# Altium PCB VCU_PCB.PcbDoc
Units mm, origin at the board's own origin, x right, y up, seen from the top; angles counter-clockwise.
Board outline 80 x 70 mm, 4 copper layers (Top Layer, Layer 1, Layer 2, Bottom Layer), stack 0.995 mm thick; 135 components, 110 nets, 438 pads, 6 vias.
Unrouted connection lines stored in the file: 255.
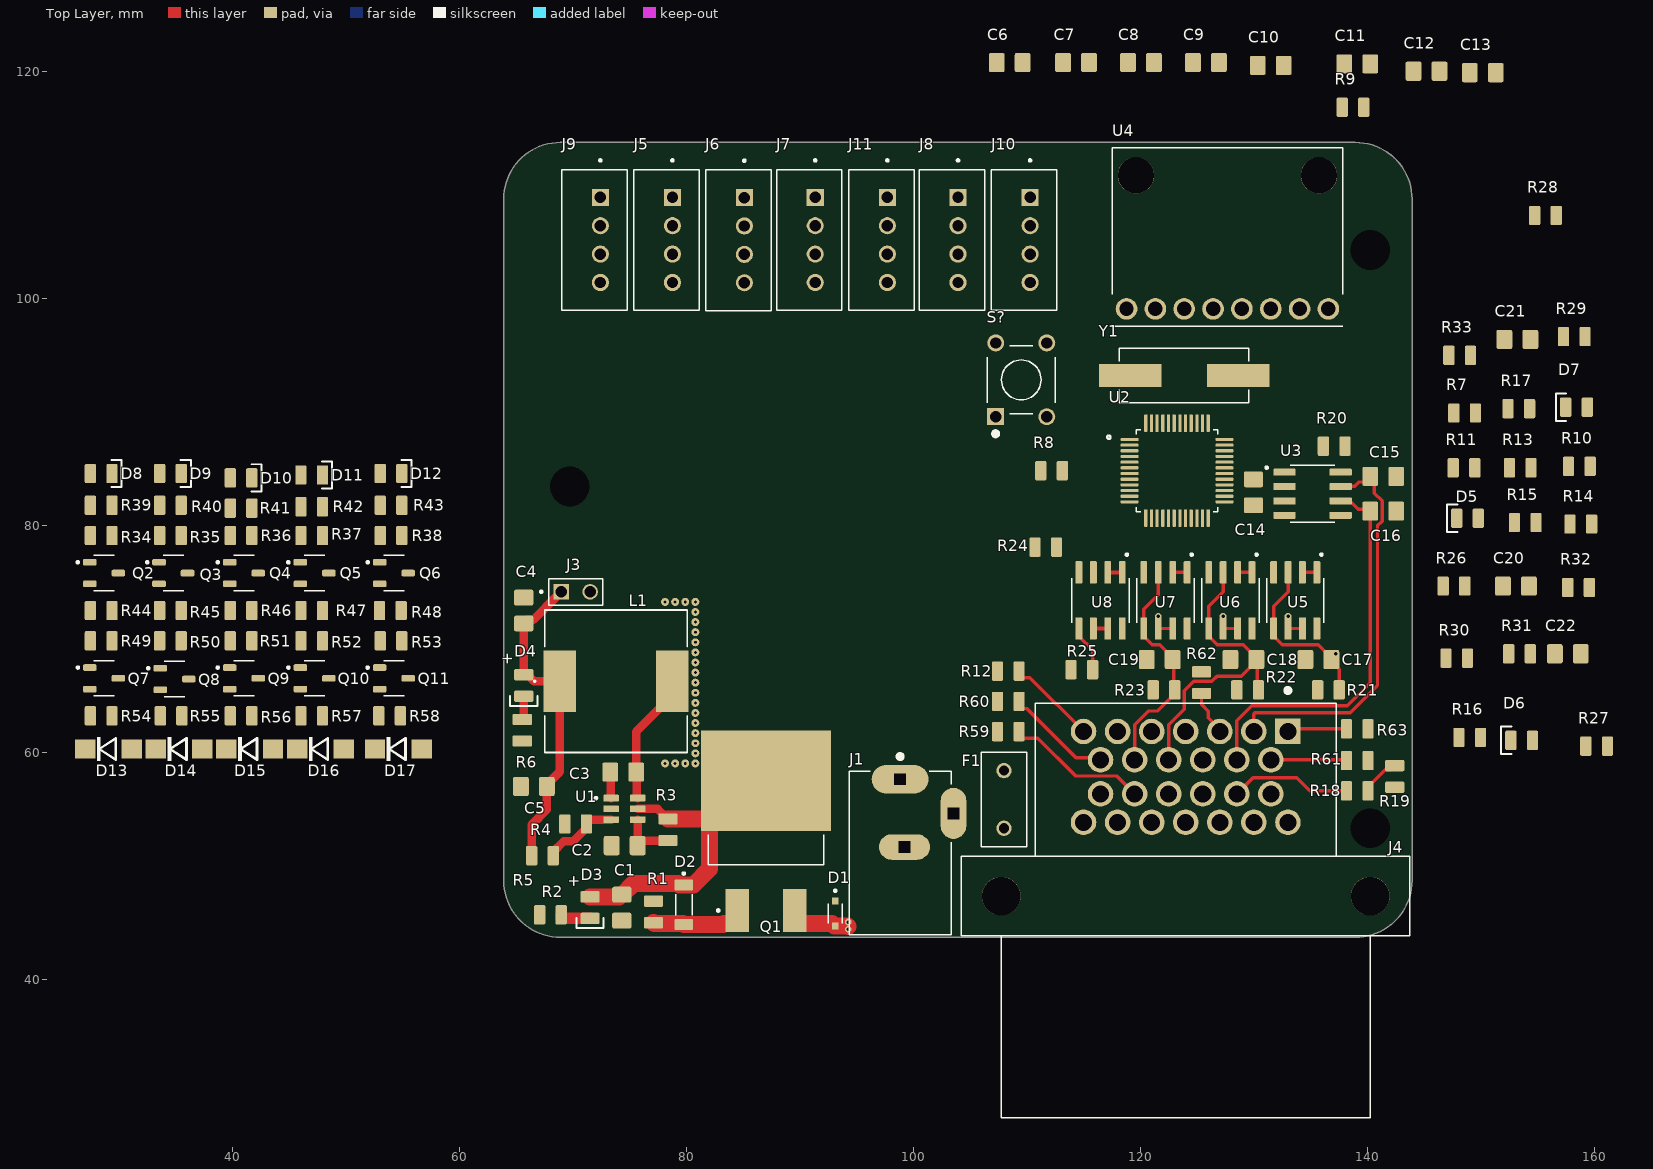
[diagram p0: Top Layer view]
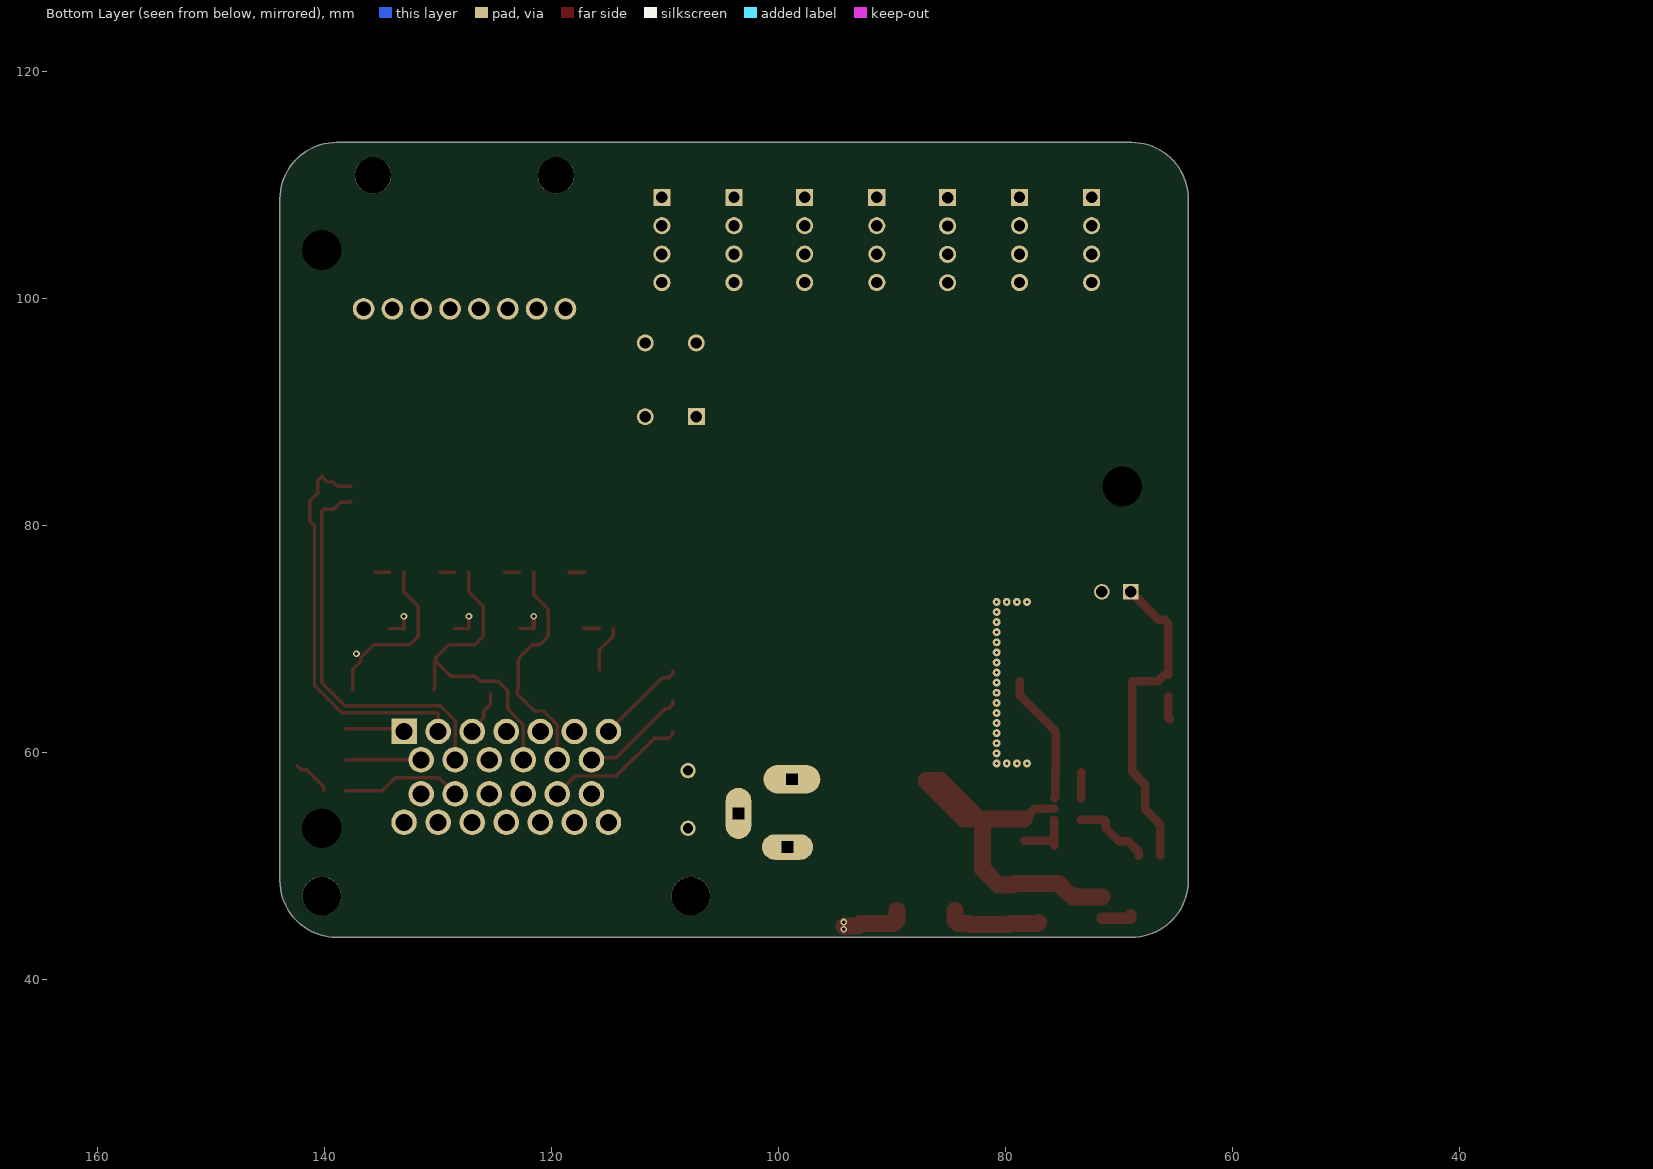
[diagram p1: Bottom Layer view, seen from below]
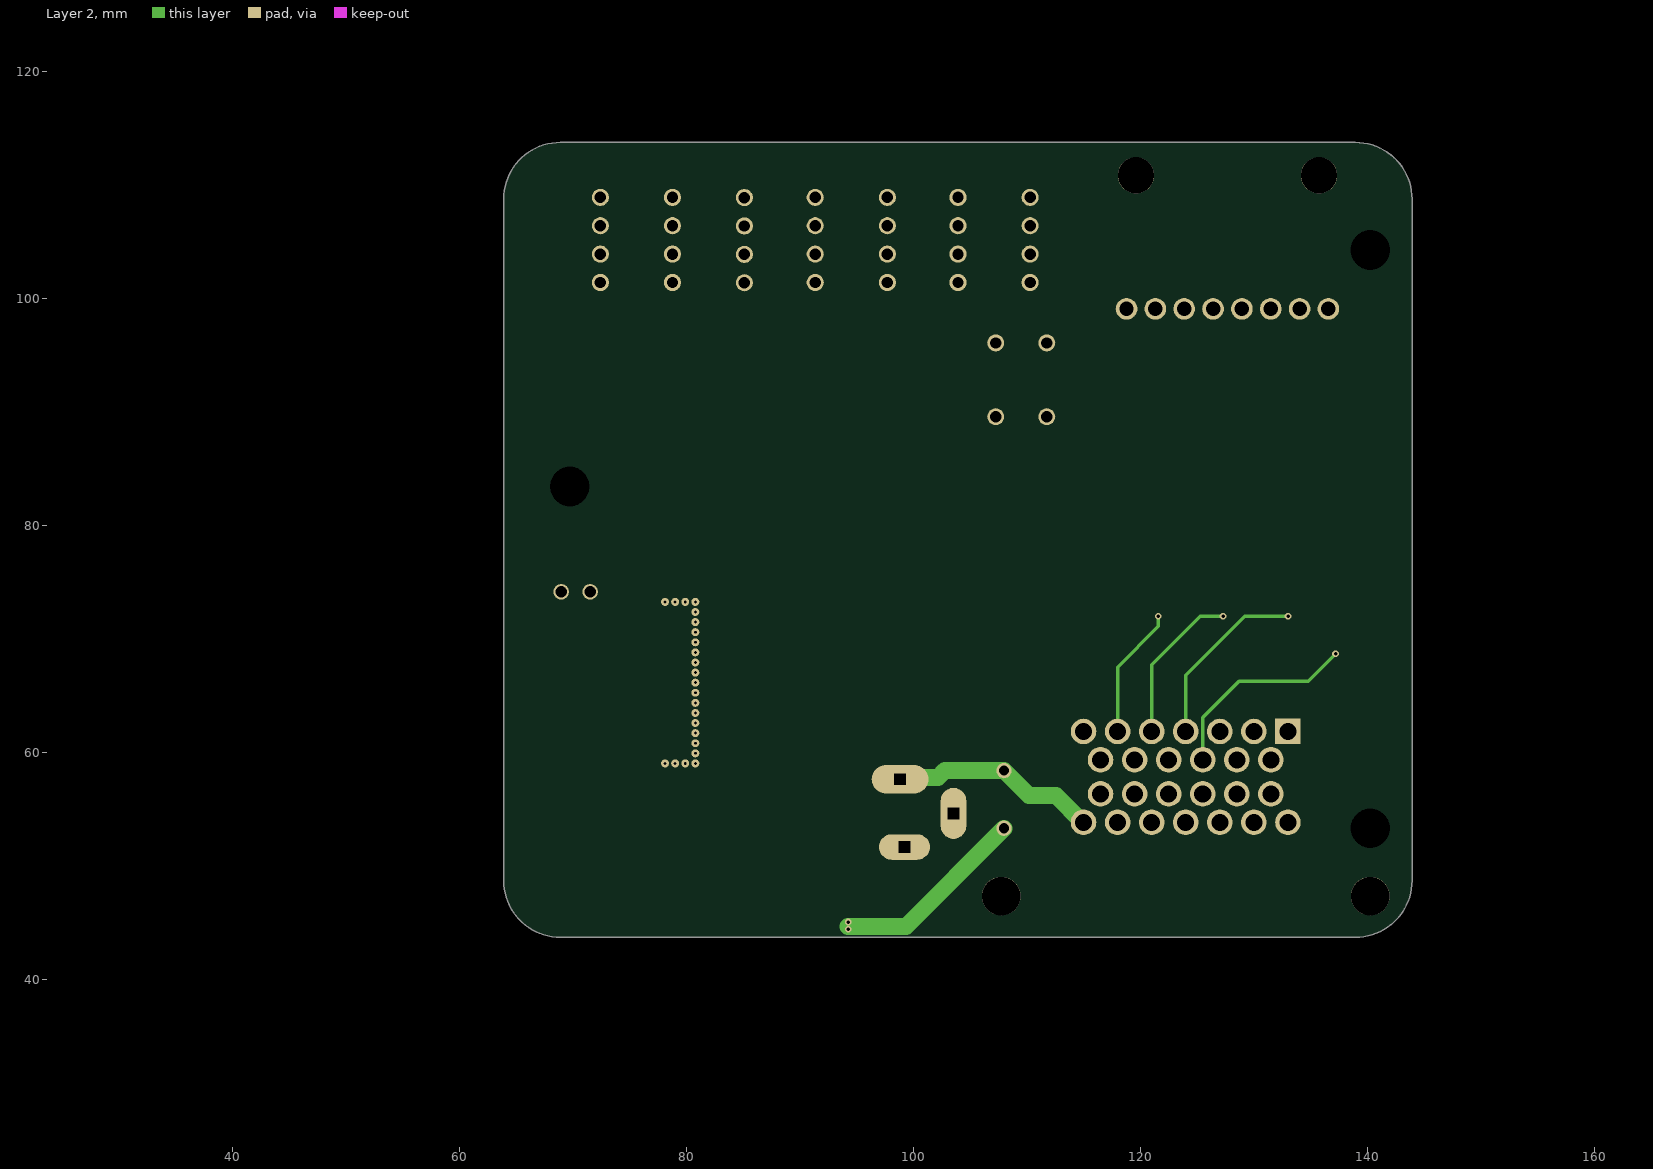
[diagram p2: Layer 2]

## Layer stack, top to bottom
Top Solder: solder mask 0.0102, Solder Resist, Dk 3.5
Top Layer: signal copper 0.0356
Dielectric 2: prepreg 0.1727, PP-020, Dk 4.5
Layer 1: signal copper 0.035
Dielectric 1: core 0.508, Core-036, Dk 4.6
Layer 2: signal copper 0.035
Dielectric 3: prepreg 0.1727, PP-020, Dk 4.5
Bottom Layer: signal copper 0.0356
Bottom Solder: solder mask 0.0102, Solder Resist, Dk 3.5

## Board outline
63.891,48.745 63.891,108.745 cw(c68.891,108.745) 68.891,113.745 138.891,113.745 cw(c138.891,108.745) 143.891,108.745 143.891,48.745 cw(c138.891,48.745) 138.891,43.745 68.891,43.745 cw(c68.891,48.745)

## Design rules (kind name [scope] priority, off if disabled: settings)
Clearance [All] p1: gap=0.15 ignorepadtopadclearanceinfootprint=FALSE
DiffPairsRouting [All] p1: maxlimit=0.254 minlimit=0.254 mostfreqgap=0.254 toplayer_minwidth=0.381 toplayer_maxwidth=0.381 toplayer_prefwidth=0.381 midlayer1_minwidth=0.381 midlayer1_maxwidth=0.381 midlayer1_prefwidth=0.381 midlayer2_minwidth=0.381 midlayer2_maxwidth=0.381 midlayer2_prefwidth=0.381 bottomlayer_minwidth=0.381 bottomlayer_maxwidth=0.381 bottomlayer_prefwidth=0.381 maxuncoupledlength=12.7
PolygonConnect [All] p1: connectstyle=Relief reliefconductorwidth=0.254 reliefentries=4 polygonreliefangle="90 Angle" airgapwidth=0.254
RoutingVias [All] p1: holewidth=0.3 width=0.7 viastyle="Through Hole" minholewidth=0.5 minwidth=0.5 maxholewidth=0.2 maxwidth=1
SolderMaskExpansion [All] p1: expansion=0 istentingtop=FALSE
SupplyNets "Schematic Supply Nets_7" [InNet('VCC_3V3')] p1: voltage=0.000
SupplyNets "Schematic Supply Nets_5" [InNet('VCC12V')] p2: voltage=0.000
SupplyNets "Schematic Supply Nets_4" [InNet('VCC3V3B')] p3: voltage=0.000
SupplyNets "Schematic Supply Nets_3" [InNet('DC_IN_12V')] p4: voltage=0.000
SupplyNets "Schematic Supply Nets_2" [InNet('DC_FUSE_12V')] p5: voltage=0.000
SupplyNets "Schematic Supply Nets_1" [InNet('GND')] p6: voltage=0.000
SupplyNets "Schematic Supply Nets" [InNet('VCC3V3')] p7: voltage=0.000
Width [All] p1: maxlimit=2 minlimit=0.15 preferedwidth=0.2
29 further rules are at their usual default settings.

## Classes and differential pairs
differential pair CAN: +CAN_P -CAN_N

## Components (designator, comment, footprint, x,y, rotation, side; value= is the part's Value field where it differs from the comment)
C1 "22uF" CAP_0805 74.295,46.355 r270 top
C2 "100nF" CAP_0805 74.549,51.816 r180 top
C3 "100nF" CAP_0805 74.422,58.293 r0 top
C4 "100nF" CAP_0805 65.659,72.517 r90 top
C5 "22uF" CAP_0805 66.548,57.023 r180 top
C6 "100nF" CAP_0805 108.458,120.777 r0 top
C7 "100nF" CAP_0805 114.3,120.777 r0 top
C8 "100nF" CAP_0805 120.015,120.777 r0 top
C9 "2.2uF" CAP_0805 125.73,120.777 r0 top
C10 "100nF" CAP_0805 131.445,120.523 r0 top
C11 "100nF" CAP_0805 139.065,120.65 r0 top
C12 "20pF" CAP_0805 145.161,120.015 r0 top
C13 "20pF" CAP_0805 150.114,119.888 r0 top
C14 "100nF" CAP_0805 129.921,82.931 r90 top
C15 "20pF" CAP_0805 141.351,84.328 r0 top
C16 "20pF" CAP_0805 141.351,81.28 r0 top
C17 "100nF" CAP_0805 135.636,68.199 r0 top
C18 "100nF" CAP_0805 129.032,68.199 r0 top
C19 "100nF" CAP_0805 121.666,68.199 r0 top
C20 "100nF" CAP_0805 153.035,74.676 r0 top
C21 "100nF" CAP_0805 153.162,96.393 r0 top
C22 "22nF" CAP_0805 157.607,68.707 r0 top
D1 "PESD1LIN" DIO_PESD1LIN 93.091,45.847 r270 top
D2 "ZMM2V2" DIOMELF3514N 79.756,46.609 r270 top
D3 "BLUE" LED_0805_BLUE 71.501,46.355 r90 top
D4 "BLUE" LED_0805_BLUE 65.659,65.913 r90 top
D5 "BLUE" LED_0805_BLUE 148.778,80.645 r0 top
D6 "BLUE" LED_0805_BLUE 153.543,61.087 r0 top
D7 "BLUE" LED_0805_BLUE 158.369,90.424 r0 top
D8 "BLUE" LED_0805_BLUE 28.448,84.582 r180 top
D9 "BLUE" LED_0805_BLUE 34.544,84.582 r180 top
D10 "BLUE" LED_0805_BLUE 40.767,84.201 r180 top
D11 "BLUE" LED_0805_BLUE 46.99,84.455 r180 top
D12 "BLUE" LED_0805_BLUE 53.975,84.582 r180 top
D13 "SS34-A" DO-214AC 29.083,60.325 r0 top
D14 "SS34-A" DO-214AC 35.306,60.325 r0 top
D15 "SS34-A" DO-214AC 41.529,60.325 r0 top
D16 "SS34-A" DO-214AC 47.752,60.325 r0 top
D17 "SS34-A" DO-214AC 54.61,60.325 r0 top
F1 "0697H0315-01" FUSRR508W60L835T400H810 107.95,55.88 r270 top
J1 "PJ-002B" CUI_PJ-002B 98.806,57.658 r270 top
J3 "3-644456-2" TE_3-644456-2 68.961,74.168 r0 top
J4 "9-6437287-8" TE_9-6437287-8 123.958,47.371 r0 top
J5 "B4B-XH-A" JST_B4B-XH-A 78.232,105.156 r90 top
J6 "B4B-XH-A" JST_B4B-XH-A 84.565,105.136 r90 top
J7 "B4B-XH-A" JST_B4B-XH-A 90.805,105.156 r90 top
J8 "B4B-XH-A" JST_B4B-XH-A 103.378,105.156 r90 top
J9 "B4B-XH-A" JST_B4B-XH-A 71.882,105.156 r90 top
J10 "B4B-XH-A" JST_B4B-XH-A 109.728,105.156 r90 top
J11 "B4B-XH-A" JST_B4B-XH-A 97.155,105.156 r90 top
L1 "10uH" IND_CDRH127/LDNP-470MC_SUM 73.787,66.294 r0 top
Q1 "IRF4905STRRPBF" TRANS_IRF4905STRRPBF 86.995,53.086 r90 top
Q2 "AO3400A" SOT95P280X125-3N 28.702,75.819 r0 top
Q3 "AO3400A" SOT95P280X125-3N 34.798,75.819 r0 top
Q4 "AO3400A" SOT95P280X125-3N 41.021,75.819 r0 top
Q5 "AO3400A" SOT95P280X125-3N 47.244,75.819 r0 top
Q6 "AO3400A" SOT95P280X125-3N 54.229,75.819 r0 top
Q7 "AO3407A" SOT95P280X125-3N 28.702,66.548 r0 top
Q8 "AO3407A" SOT95P280X125-3N 34.91,66.482 r0 top
Q9 "AO3407A" SOT95P280X125-3N 41.021,66.548 r0 top
Q10 "AO3407A" SOT95P280X125-3N 47.244,66.548 r0 top
Q11 "AO3407A" SOT95P280X125-3N 54.229,66.548 r0 top
R1 "10K" RES_0805 77.089,45.974 r270 top
R2 "5K" RES_0805 68.011,45.72 r0 top
R3 "10K" RES_0805 78.359,53.213 r270 top
R4 "22K" RES_0805 70.231,53.721 r0 top
R5 "100K" RES_0805 67.31,50.927 r180 top
R6 "1.5K" RES_0805 65.532,61.976 r90 top
R7 "0R" RES_0805 148.524,89.916 r0 top
R8 "2.2K" RES_0805 112.141,84.836 r0 top
R9 "2.2K" RES_0805 138.684,116.84 r0 top
R10 "220R" RES_0805 158.623,85.217 r0 top
R11 "220R" RES_0805 148.463,85.09 r0 top
R12 "220R" RES_0805 108.331,67.183 r0 top
R13 "220R" RES_0805 153.416,85.09 r0 top
R14 "220R" RES_0805 158.75,80.137 r0 top
R15 "220R" RES_0805 153.858,80.264 r0 top
R16 "220R" RES_0805 148.971,61.341 r0 top
R17 "220R" RES_0805 153.289,90.297 r0 top
R18 "27K" RES_0805 139.065,56.642 r0 top
R19 "10K" RES_0805 142.367,57.912 r90 top
R20 "4.7K" RES_0805 137.033,86.995 r0 top
R21 "10K" RES_0805 136.525,65.532 r0 top
R22 "10K" RES_0805 129.413,65.532 r0 top
R23 "10K" RES_0805 122.047,65.532 r0 top
R24 "2.2K" RES_0805 111.633,78.105 r0 top
R25 "2.2K" RES_0805 114.808,67.31 r0 top
R26 "1.5K" RES_0805 147.574,74.676 r0 top
R27 "1.5K" RES_0805 160.147,60.579 r0 top
R28 "10K" RES_0805 155.636,107.315 r0 top
R29 "20K" RES_0805 158.176,96.647 r0 top
R30 "27K" RES_0805 147.828,68.326 r0 top
R31 "10K" RES_0805 153.35,68.707 r0 top
R32 "27K" RES_0805 158.557,74.549 r0 top
R33 "10K" RES_0805 148.082,94.996 r0 top
R34 "1K" RES_0805 28.448,79.121 r180 top
R35 "1K" RES_0805 34.544,79.121 r180 top
R36 "1K" RES_0805 40.767,79.121 r180 top
R37 "1K" RES_0805 46.99,79.121 r180 top
R38 "1K" RES_0805 53.975,79.121 r180 top
R39 "1K" RES_0805 28.448,81.788 r0 top
R40 "1K" RES_0805 34.544,81.788 r0 top
R41 "1K" RES_0805 40.767,81.534 r0 top
R42 "1K" RES_0805 46.99,81.661 r0 top
R43 "1K" RES_0805 53.975,81.788 r0 top
R44 "10K" RES_0805 28.448,72.517 r0 top
R45 "10K" RES_0805 34.544,72.517 r0 top
R46 "10K" RES_0805 40.767,72.517 r0 top
R47 "10K" RES_0805 46.99,72.517 r0 top
R48 "10K" RES_0805 53.909,72.517 r0 top
R49 "1K" RES_0805 28.448,69.85 r180 top
R50 "1K" RES_0805 34.544,69.85 r180 top
R51 "1K" RES_0805 40.767,69.85 r180 top
R52 "1K" RES_0805 46.99,69.85 r180 top
R53 "1K" RES_0805 53.975,69.85 r180 top
R54 "10K" RES_0805 28.448,63.246 r180 top
R55 "10K" RES_0805 34.605,63.246 r180 top
R56 "10K" RES_0805 40.767,63.246 r180 top
R57 "10K" RES_0805 46.99,63.246 r180 top
R58 "10K" RES_0805 53.848,63.246 r180 top
R59 "10K" RES_0805 108.331,61.849 r0 top
R60 "" RES_0805 108.331,64.516 r0 top
R61 "" RES_0805 139.065,59.309 r180 top
R62 "" RES_0805 125.349,66.167 r270 top
R63 "" RES_0805 139.065,62.103 r180 top
S? "FSM8JH" SW_FSM8JH 109.474,92.837 r90 top
U1 "MT2492" "PCBComponent_1 - duplicate" 84.301,55.56 r0 top
U2 "STM32F103C8T6" QFP50P900X900X160-48N 123.19,84.836 r0 top
U3 "SN65HVD230D" SOIC127P599X175-8N 135.128,82.804 r0 top
U4 "GY-521" MODULE_GY-521 127.635,105.41 r90 top
U5 "TLV2372IDR" SOIC127P599X175-8N 133.604,73.406 r270 top
U6 "TLV2372IDR" SOIC127P599X175-8N 127.889,73.406 r270 top
U7 "TLV2372IDR" SOIC127P599X175-8N 122.174,73.406 r270 top
U8 "TLV2372IDR" SOIC127P599X175-8N 116.459,73.406 r270 top
Y1 "8MHz" XTAL_ECS-80-20-5PVX 123.825,93.218 r180 top

## Footprints (in the part's own frame and the unit in brackets; to place one, negate y for a bottom-side part, rotate by r counter-clockwise, add the part's x,y. Pads: shape width x height; smd on the part's side, far side on the other; paste and mask are expansions set on the pad)
CAP_0805 [mm]
  rrect25% 1.4x1.7 smd: 1(-1.143,0) 2(1.143,0)
  body extent -1.15,-0.76 1.15,0.79, height 1.01
CUI_PJ-002B [mm]
  oval 2.5x5 hole 1 square: 1(0,0)
  oval 2.25x4.5 hole 1 square: 2(5.969,0.381)
  oval 4.5x2.25 hole 1 square: 3(3,4.7)
  silkscreen extent -2.2,-4.5 13.7,4.5, body extent -0.81,-4.63 13.59,4.77, height 11
DIO_PESD1LIN [mm]
  rect 0.6x0.6 smd paste-0.05: 1(-1.1,0) 2(1.1,0)
  silkscreen extent -2.1,-0.63 0.85,0.63, body extent -1.34,-0.65 1.34,0.65, height 1.15
DIOMELF3514N [mm]
  rrect25% 0.96x1.65 smd paste+0 mask+0.102: 1(-1.735,0) 2(1.735,0)
  silkscreen extent -2.85,-0.72 0.93,0.72
DO-214AC [mm]
  rect 1.8x1.7 smd: A(2.05,0) C(-2.05,0)
  silkscreen extent -1,-1.05 0.65,1.05
FUSRR508W60L835T400H810 [mm]
  round 1.35 hole 0.9: 1(-2.54,0) 2(2.54,0)
  silkscreen extent -4.18,-2 4.18,2, body extent -4.18,-2 4.18,2, height 8.1
IND_CDRH127/LDNP-470MC_SUM [mil]
  rect 114x213 smd: 1(-195,0) 2(195,0)
  silkscreen extent -285,-247 247,247, body extent -236,-236 236,236, height 315
JST_B4B-XH-A [mm]
  rect 1.508x1.508 / inner round 1.508 / far side rect 1.508x1.508 hole 1: 1(3.75,-0.525)
  round 1.508 hole 1: 2(1.25,-0.525) 3(-1.25,-0.525) 4(-3.75,-0.525)
  silkscreen extent -6.2,-2.88 7.1,2.88, body extent -6.2,-2.88 6.2,2.88, height 7
LED_0805_BLUE [mm]
  rrect25% 1x1.7 smd: A(0.95,0) K(-0.95,0)
  silkscreen extent -1.8,-1.2 -0.9,1.2, body extent -1,-0.63 1,0.63, height 1.12
MODULE_GY-521 [mm]
  round 1.905 hole 1.27 mask+0.102: AD0(-6.33,-6.35) GND(-6.33,6.35) INT(-6.33,-8.89) SCL(-6.33,3.81) SDA(-6.33,1.27) VCC(-6.33,8.89) XCL(-6.33,-3.81) XDA(-6.33,-1.27)
  round 3.2 hole 3.2 unplated mask+0: ""(5.43,8.06) ""(5.43,-8.06)
  silkscreen extent -7.85,-10.15 7.85,10.15, body extent -7.85,-10.15 7.85,10.15, height 3
"PCBComponent_1 - duplicate" [mm]
  rrect25% 1.37x0.59 smd: 1(-10.949,0.442) 2(-10.949,-0.508) 3(-10.949,-1.458) 4(-8.609,-1.458) 5(-8.609,-0.508) 6(-8.609,0.442)
  silkscreen extent -12.38,0.34 -12.18,0.54, body extent -11.18,-1.97 -8.38,0.95, height 1.4
QFP50P900X900X160-48N [mm]
  rrect50% 1.56x0.28 smd: 1(-4.18,2.75) 2(-4.18,2.25) 3(-4.18,1.75) 4(-4.18,1.25) 5(-4.18,0.75) 6(-4.18,0.25) 7(-4.18,-0.25) 8(-4.18,-0.75) 9(-4.18,-1.25) 10(-4.18,-1.75) 11(-4.18,-2.25) 12(-4.18,-2.75) 25(4.18,-2.75) 26(4.18,-2.25) 27(4.18,-1.75) 28(4.18,-1.25) 29(4.18,-0.75) 30(4.18,-0.25) 31(4.18,0.25) 32(4.18,0.75) 33(4.18,1.25) 34(4.18,1.75) 35(4.18,2.25) 36(4.18,2.75)
  rrect50% 0.28x1.56 smd: 13(-2.75,-4.18) 14(-2.25,-4.18) 15(-1.75,-4.18) 16(-1.25,-4.18) 17(-0.75,-4.18) 18(-0.25,-4.18) 19(0.25,-4.18) 20(0.75,-4.18) 21(1.25,-4.18) 22(1.75,-4.18) 23(2.25,-4.18) 24(2.75,-4.18) 37(2.75,4.18) 38(2.25,4.18) 39(1.75,4.18) 40(1.25,4.18) 41(0.75,4.18) 42(0.25,4.18) 43(-0.25,4.18) 44(-0.75,4.18) 45(-1.25,4.18) 46(-1.75,4.18) 47(-2.25,4.18) 48(-2.75,4.18)
  silkscreen extent -6.15,-3.6 3.6,3.6, body extent -4.5,-4.5 4.5,4.5, height 1.6
RES_0805 [mm]
  rrect25% 1x1.7 smd: 1(-0.95,0) 2(0.95,0)
  body extent -1,-0.63 1,0.63, height 0.47
SOIC127P599X175-8N [mm]
  rrect25% 1.97x0.6 smd paste+0 mask+0.102: 1(-2.47,1.905) 2(-2.47,0.635) 3(-2.47,-0.635) 4(-2.47,-1.905) 5(2.47,-1.905) 6(2.47,-0.635) 7(2.47,0.635) 8(2.47,1.905)
  silkscreen extent -4.14,-2.52 1.95,2.52, body extent -3,-2.45 3,2.45, height 1.75
SOT95P280X125-3N [mm]
  rrect50% 1.21x0.59 smd: 1(-1.255,0.95) 2(-1.255,-0.95) 3(1.255,0)
  silkscreen extent -2.41,-1.55 0.9,1.55, body extent -1.4,-1.45 1.4,1.45, height 1.25
SW_FSM8JH [mm]
  rect 1.498x1.498 / inner round 1.498 / far side rect 1.498x1.498 hole 0.99: 1(-3.25,2.25)
  round 1.498 hole 0.99: 2(-3.25,-2.25) 3(3.25,2.25) 4(3.25,-2.25)
  silkscreen extent -4.95,-3 3,3, body extent -3.95,-3 3.95,3, height 9.5
TE_3-644456-2 [mm]
  rect 1.37x1.37 / inner round 1.37 / far side rect 1.37x1.37 hole 1.02: 1(0,0)
  round 1.37 hole 1.02: 2(2.54,0)
  silkscreen extent -1.87,-1.17 3.66,1.17, body extent -1.12,-1.17 3.66,1.17, height 10.03
TE_9-6437287-8 [mm]
  rect 2.25x2.25 hole 1.5: 1(9,14.5)
  round 2.25 hole 1.5: 2(6,14.5) 3(3,14.5) 4(0,14.5) 5(-3,14.5) 6(-6,14.5) 7(-9,14.5) 8(7.5,12) 9(4.5,12) 10(1.5,12) 11(-1.5,12) 12(-4.5,12) 13(-7.5,12) 14(7.5,9) 15(4.5,9) 16(1.5,9) 17(-1.5,9) 18(-4.5,9) 19(-7.5,9) 20(9,6.5) 21(6,6.5) 22(3,6.5) 23(0,6.5) 24(-3,6.5) 25(-6,6.5) 26(-9,6.5)
  round 3.4 hole 3.4 unplated: ""(-16.25,0) ""(16.25,0)
  silkscreen extent -19.75,-19.5 19.75,18.31
TRANS_IRF4905STRRPBF [mm]
  rect 3.81x2.08 smd: 1(-6.985,2.54) 3(-6.985,-2.54)
  rect 8.89x11.43 smd paste-7: 2(4.445,0)
  silkscreen extent -7.08,-5.08 -0.32,5.08, body extent -7.62,-5.08 7.62,5.08, height 4.83
XTAL_ECS-80-20-5PVX [mm]
  rect 5.5x2 smd: 1(-4.75,0) 2(4.75,0)
  silkscreen extent -5.7,-2.4 5.7,2.4, body extent -6.6,-2.35 6.6,2.35, height 2.6

## Part data
C1 C2 C3 C4 C5 C6 C7 C8 C9 C10 C11 C12 C13 C14 C15 C16 C17 C18 C19 C20 C21 C22: library part CAP_0805, "Capacitor SMD 0805"
D1: "44V, 70V Clamp 3A (8/20Âµs) Ipp Tvs Diode Surface Mount SOD-323", Package="SOD-323 Vishay Semiconductor Diodes Division", Check_prices=https://www.snapeda.com/parts/PESD1LIN/Nexperia/view-part/?ref=eda, MF="Nexperia USA", MP=PESD1LIN, SnapEDA_Link=https://www.snapeda.com/parts/PESD1LIN/Nexperia/view-part/?ref=snap
D2: "2.2V 500mW Silicon Epitaxial Planar Zener Diodes SMD MiniMELF (LL34)", Package=None, Check_prices=https://www.snapeda.com/parts/ZMM2V2/Kingtronics/view-part/?ref=eda, MF=Kingtronics, MP=ZMM2V2, SnapEDA_Link=https://www.snapeda.com/parts/ZMM2V2/Kingtronics/view-part/?ref=snap
D3 D4 D5 D6 D7 D8 D9 D10 D11 D12: library part LED_0805_BLUE, "LED 0805 BLUE SMD"
D13 D14 D15 D16 D17: "Schottky barrier diode, 3A, 40V", Package=None, Check_prices=https://www.snapeda.com/parts/SS34A/HY+Electronic/view-part/?ref=eda, MF="hy electronic corp", MP=SS34A, SnapEDA_Link=https://www.snapeda.com/parts/SS34A/HY+Electronic/view-part/?ref=snap
F1: "2-Pin Radial Fuse", Package="Radial Box  Bel Fuse", Check_prices=https://www.snapeda.com/parts/0697H0315-01/Bel+Circuit+Protection/view-part/?ref=eda, MF="Bel Fuse", MP=0697H0315-01, SnapEDA_Link=https://www.snapeda.com/parts/0697H0315-01/Bel+Circuit+Protection/view-part/?ref=snap
J1: "2.5 x 6.5 mm, 2.5 A, Horizontal, Through Hole, Dc Power Jack Connector", Package=None, Check_prices=https://www.snapeda.com/parts/PJ-002B/Same+Sky/view-part/?ref=eda, MF="Same Sky", MP=PJ-002B, SnapEDA_Link=https://www.snapeda.com/parts/PJ-002B/Same+Sky/view-part/?ref=snap
J3: "HEADER ASSEMBLY, NARROW, MTA-100, 2 POSITION, STRAIGHT", Package=None, Check_prices=https://www.snapeda.com/parts/3-644456-2/TE+Connectivity+AMP+Connectors/view-part/?ref=eda, MF="TE Connectivity", MP=3-644456-2, SnapEDA_Link=https://www.snapeda.com/parts/3-644456-2/TE+Connectivity+AMP+Connectors/view-part/?ref=snap
J4: Package=None, Availability=Unavailable, MF="{'manufacturer': 'TE Connectivity'}", MP=9-6437287-8, Price=None
J5 J6 J7 J8 J9 J10 J11: "Connector Header Through Hole 4 position 0.098 (2.50mm)", Package=None, Check_prices=https://www.snapeda.com/parts/B4B-XH-A/JST/view-part/?ref=eda, MF="JST Sales", MP=B4B-XH-A, SnapEDA_Link=https://www.snapeda.com/parts/B4B-XH-A/JST/view-part/?ref=snap
L1: library part CDRH127/LDNP-470MC, "Inductor Power Shielded Drum Core 47uH 20% 1KHz Ferrite 4.1A 0.078Ohm DCR T/R", Package="Non Standard Sumida", Check_prices=https://www.snapeda.com/parts/CDRH127/LDNP-470MC/Sumida/view-part/?ref=eda, MF="Sumida Corporation", MP=CDRH127/LDNP-470MC, SnapEDA_Link=https://www.snapeda.com/parts/CDRH127/LDNP-470MC/Sumida/view-part/?ref=snap
Q1: "RoHS Compliant", Package="D2PAK Infineon", Availability="In Stock", Check_prices=https://www.snapeda.com/parts/IRF4905STRRPBF/Infineon+Technologies/view-part/?ref=eda, MF="Infineon Technologies", MP=IRF4905STRRPBF, Price=None, Purchase-URL=https://pricing.snapeda.com/search/part/IRF4905STRRPBF/?ref=eda, SnapEDA_Link=https://www.snapeda.com/parts/IRF4905STRRPBF/Infineon+Technologies/view-part/?ref=snap
Q2 Q3 Q4 Q5 Q6: "N-Channel 30 V 5.8A (Ta) 1.4W (Ta) Surface Mount SOT-23", Package=None, Check_prices=https://www.snapeda.com/parts/AO3400A/UMW/view-part/?ref=eda, MF=UMW, MP=AO3400A, SnapEDA_Link=https://www.snapeda.com/parts/AO3400A/UMW/view-part/?ref=snap
Q7 Q8 Q9 Q10 Q11: "P-Channel 30 V 4.3A (Ta) 1.4W (Ta) Surface Mount SOT-23-3", Package="SOT-23 Alpha &amp; Omega Semiconductor", Check_prices=https://www.snapeda.com/parts/AO3407A/Alpha/view-part/?ref=eda, MF="Alpha &", MP=AO3407A, SnapEDA_Link=https://www.snapeda.com/parts/AO3407A/Alpha/view-part/?ref=snap
R1 R2 R3 R4 R5 R6 R7 R8 R9 R10 R11 R12 R13 R14 R15 R16 R17 R18 R19 R20 R21 R22 R23 R24 R25 R26 R27 R28 R29 R30 R31 R32 R33 R34 R35 R36 R37 R38 R39 R40 R41 R42 R43 R44 R45 R46 R47 R48 R49 R50 R51 R52 R53 R54 R55 R56 R57 R58 R59 R60 R61 R62 R63: library part RES_0805, "Resistor SMD 0805"
S?: "Tactile Switch SPST-NO Top Actuated Through Hole", Package=None, Availability="In Stock", Check_prices=https://www.snapeda.com/parts/FSM8JH/TE+Connectivity+ALCOSWITCH+Switches/view-part/?ref=eda, MF="TE Connectivity", MP=FSM8JH, Price=None, SnapEDA_Link=https://www.snapeda.com/parts/FSM8JH/TE+Connectivity+ALCOSWITCH+Switches/view-part/?ref=snap
U1: "DC-DC step-down converter (buck converter)"
U2: "ARM® Cortex®-M3 STM32F1 Microcontroller IC 32-Bit 72MHz 64KB (64K x 8) FLASH 48-LQFP (7x7)", Package="LQFP-48 STMicroelectronics", Check_prices=https://www.snapeda.com/parts/STM32F103C8T6/STMicroelectronics/view-part/?ref=eda, MF=STMicroelectronics, MP=STM32F103C8T6, SnapEDA_Link=https://www.snapeda.com/parts/STM32F103C8T6/STMicroelectronics/view-part/?ref=snap
U3: "3.3 V CAN Transceiver with Standby Mode", Package="SOIC-8 Texas Instruments", Check_prices=https://www.snapeda.com/parts/SN65HVD230D/Texas+Instruments/view-part/?ref=eda, MF="Texas Instruments", MP=SN65HVD230D, SnapEDA_Link=https://www.snapeda.com/parts/SN65HVD230D/Texas+Instruments/view-part/?ref=snap
U4: "Triple Axis Accelerometer Gyro Breakout", Package=Package, Check_prices=https://www.snapeda.com/parts/GY-521/GODREAM+FORDREAM+CO.%252C+LIMITED/view-part/?ref=eda, MF="GODREAM FORDREAM CO., LIMITED", MP=GY-521, SnapEDA_Link=https://www.snapeda.com/parts/GY-521/GODREAM+FORDREAM+CO.%252C+LIMITED/view-part/?ref=snap
U5 U6 U7 U8: "Dual, 16-V, 3-MHz, RRIO operational amplifier", Package="SOIC-8 Texas Instruments", Check_prices=https://www.snapeda.com/parts/TLV2372IDR/Texas+Instruments/view-part/?ref=eda, MF="Texas Instruments", MP=TLV2372IDR, SnapEDA_Link=https://www.snapeda.com/parts/TLV2372IDR/Texas+Instruments/view-part/?ref=snap
Y1: library part ECS-80-20-5PVX, "SMD Quartz crystal", Package=None, Availability=Unavailable, MP=ECS-80-20-5PVX, Price=None

## Free pads (board coordinates)
  round 0 hole 3.5 unplated: 1(140.208,53.34) 2(140.208,104.267) 3(69.723,83.439)
  round 0.7 hole 0.25: 4(80.772,72.39) 5(80.772,71.501) 6(80.772,70.612) 7(80.772,69.723) 8(80.772,68.834) 9(80.772,67.945) 10(80.772,67.056) 11(80.772,66.167) 12(80.772,65.278) 13(80.772,64.389) 14(80.772,63.5) 15(80.772,62.611) 16(80.772,61.722) 17(80.772,60.833) 18(80.772,59.944) 19(80.772,59.055) 20(79.883,59.055) 21(78.994,59.055) 22(78.105,59.055) 23(80.772,73.279) 24(79.883,73.279) 25(78.105,73.279) 25(78.994,73.279)

## Via types
v1: diameter 0.6, hole 0.3, Top Layer to Bottom Layer, 6 vias

## Nets (pads, with @x,y where several pads share a name; then routed paths per layer and width w, separated by ;. In a path a pad name is that pad's centre, name@x,y a point inside that pad or via, vN(x,y) a via of type N, cw(c..) or ccw(c..) an arc to the next point about the centre after c; other vN are vias at no path point)
APP1SHIFTVCC: J4.13 R60.2 | length 9.5
  Top Layer w0.3: R60.2 109.281,64.242 109.631,63.892 109.971,63.892 114.296,59.567 116.262,59.567 J4.13
APP2SHIFTVCC: J4.3 R62.2 | length 4
  Top Layer w0.3: R62.2 125.349,64.267 125.948,63.668 125.948,63.089 126.958,62.079 J4.3
APPS1: C17.2 J4.10 R21.2 U5.3 U5.5 | length 32.7
  Top Layer w0.3: U5.3 132.969,74.168 131.699,72.898 U5.5 131.699,70.251 132.45,69.5 135.628,69.5 136.779,68.349 C17.2 ; C17.2@136.779,68.049 137.475,67.353 R21.2
  Layer 2 w0.3: J4.10 125.458,63.101 128.651,66.294 134.747,66.294 v1(137.16,68.707)
APPS1HIFTGND: J4.8 R61.2 | length 6.7
  Top Layer w0.3: J4.8 138.053,59.371 R61.2
APPS2: C18.2 J4.11 R22.2 U6.3 U6.5 | length 28.2
  Top Layer w0.3: J4.11 122.458,62.444 123.838,63.823 123.838,65.464 124.65,66.276 126.267,66.276 126.713,66.723 128.849,66.723 130.175,68.049 C18.2 ; U6.3 127.254,74.168 125.984,72.898 U6.5 125.984,70.251 126.735,69.5 129.024,69.5 130.175,68.349 C18.2 ; R22.2 130.269,65.626 130.269,68.105 C18.2
APPS2HIFTGND: J4.1 R63.2 | length 5.3
  Top Layer w0.3: J4.1 133.19,62.103 R63.2
BL: D14.A J4.21 Q8.3
BPS: C19.2 J4.12 R23.2 U7.3 U7.5 | length 20.5
  Top Layer w0.3: J4.12 119.458,62.444 120.69,63.675 121.49,63.675 122.997,65.182 R23.2 122.903,65.626 122.903,68.105 C19.2 122.809,68.349 121.658,69.5 121.02,69.5 120.269,70.251 U7.5 120.269,72.644 121.539,73.914 U7.3
BS: C3.1 U1.1 | length 2.3
  Top Layer w0.75: C3.1 73.315,58.257 73.315,56.039 U1.1
CAN_N: C16.1 J4.9 U3.6 | length 34.7
  Top Layer w0.3: J4.9 128.458,62.808 129.599,63.949 129.785,64.135 138.167,64.135 140.208,66.176 C16.1 140.05,81.438 139.16,81.438 138.538,82.06 137.707,82.06 U3.6
CAN_P: C15.1 J4.2 U3.7 | length 35.5
  Top Layer w0.3: J4.2 129.958,63.41 130.048,63.5 138.43,63.5 140.843,65.913 140.843,79.986 141.249,80.391 141.249,82.169 140.574,82.843 140.574,83.962 C15.1 139.715,83.835 139.207,83.835 138.848,83.476 137.635,83.476 U3.7
CFB: D16.A J4.24 Q10.3
CFM: D15.A J4.25 Q9.3
DC_FUSE_12V: D1.2 F1.2 Q1.3 | length 23.1
  Top Layer w1.5: Q1.3 89.535,45.236 89.825,44.946 92.825,44.946 93.024,44.747 D1.2 94.191,44.747 v1@94.234,44.704
  Layer 2 w1.5: v1@94.234,44.704 99.314,44.704 F1.2
  other v1: 94.234,44.45 94.234,45.085
DC_IN_12V: F1.1 J1.1 J4.26 | length 18.4
  Layer 2 w1.5: J1.1 98.956,57.808 102.131,57.808 102.743,58.42 F1.1 110.153,56.217 112.531,56.217 114.878,53.871 J4.26
DTI_APPS1: J4.4 U5.6 U5.7 | length 18.4
  Top Layer w0.3: U5.6 U5.7
  Top Layer w0.381: U5.6 v1(132.969,72.009)
  Layer 2 w0.3: J4.4 123.958,66.808 129.159,72.009 v1(132.969,72.009)
DTI_APPS2: J4.5 U6.6 U6.7 | length 16.3
  Top Layer w0.3: v1(127.254,72.009) U6.6 U6.7
  Layer 2 w0.3: J4.5 120.958,67.745 125.222,72.009 v1(127.254,72.009)
DTI_BPS: J4.6 U7.6 U7.7 | length 14
  Top Layer w0.3: U7.6 U7.7
  Top Layer w0.381: U7.6 v1(121.539,72.009)
  Layer 2 w0.3: J4.6 117.958,67.539 121.539,71.12 v1(121.539,72.009)
EN: C2.1 R3.2 U1.4 | length 5.1
  Top Layer w0.75: C2.1 U1.4 ; C2.1@75.692,51.938 76.017,52.263 R3.2
FB: R4.2 R5.1 U1.3 | length 7
  Top Layer w0.75: R5.1 68.26,51.277 69.168,52.185 69.995,52.185 71.181,53.371 R4.2 71.181,53.977 71.306,54.102 U1.3
GND: C1.2 C2.2 C4.2 C5.2 C6.2 C7.2 C8.2 C9.2 C10.1 C12.2 C13.2 C14.2 C15.2 C16.2 C17.1 C18.1 C19.1 C20.2 C21.2 C22.2 D1.1 D8.K D9.K D10.K D11.K D12.K D13.C D14.C D15.C D16.C D17.C J1.2 J1.3 J4.14 J4.20 J5.4 J6.4 J7.4 J8.4 J9.4 J10.4 J11.4 pad.4 pad.5 pad.6 pad.7 pad.8 pad.9 pad.10 pad.11 pad.12 pad.13 pad.14 pad.15 pad.16 pad.17 pad.18 pad.19 pad.20 pad.21 pad.22 pad.23 pad.24 pad.25 Q2.2 Q3.2 Q4.2 Q5.2 Q6.2 R1.1 R2.1 R4.1 R6.1 R15.1 R16.1 R17.1 R19.1 R20.1 R21.1 R22.1 R23.1 R24.1 R25.1 R29.1 R31.1 R33.1 R44.1 R45.1 R46.1 R47.1 R48.1 R59.1 R61.1 R62.1 U1.2 U2.8 U2.23 U2.35 U2.47 U3.2 U4.GND U5.4 U6.4 U7.4 U8.4
IMD_MHS: J4.17 R25.2 U8.5 | length 4.1
  Top Layer w0.3: U8.5 114.554,70.251 115.758,69.047 R25.2
IMD_OKHS: J4.16 R24.2 U8.3
L3V3S: D4.K R6.2 | length 2.1
  Top Layer w0.75: R6.2 65.534,62.926 65.659,63.051 D4.K
L12S: D3.K R2.2 | length 2.9
  Top Layer w1: R2.2 68.961,45.405 D3.K
LED_PC13: D5.K R15.2
LED_PC14: D6.K R16.2
LED_PC15: D7.K R17.2
NetC11_1: C11.1 R8.1 S?.1 S?.2
NetD2_2: D2.2 Q1.1 R1.2 | length 8.4
  Top Layer w1.5: R1.2 77.164,44.949 79.681,44.949 D2.2 83.228,44.874 83.3,44.946 84.165,44.946 84.455,45.236 Q1.1
NetD8_A: D8.A R39.1
NetD9_A: D9.A R40.1
NetD10_A: D10.A R41.1
NetD11_A: D11.A R42.1
NetD12_A: D12.A R43.1
NetQ2_3: Q2.3 R49.1
NetQ3_3: Q3.3 R50.1
NetQ4_3: Q4.3 R51.1
NetQ5_3: Q5.3 R52.1
NetQ6_3: Q6.3 R53.1
NetQ7_1: Q7.1 R49.2 R54.1
NetQ8_1: Q8.1 R50.2 R55.1
NetQ9_1: Q9.1 R51.2 R56.1
NetQ10_1: Q10.1 R52.2 R57.1
NetQ11_1: Q11.1 R53.2 R58.1
NetR20_2: R20.2 U3.8
PUMP: D17.A J4.23 Q11.3
SDC_SEN: J4.15 R18.1 | length 10.7
  Top Layer w0.3: J4.15 129.883,57.796 133.739,57.796 134.893,56.642 R18.1
SP: D13.A J4.22 Q7.3
ST_APPS1: C20.1 R26.1 U2.11
ST_APPS2: C21.1 R27.1 U2.12
ST_BL: Q3.1 R35.2 R45.2
ST_BOOT0: R8.2 U2.44
ST_BPS: C22.1 R28.2 R29.2 U2.13
ST_CAN_RXD: U2.32 U3.4
ST_CAN_TXD: U2.33 U3.1
ST_CFB: Q5.1 R37.2 R47.2
ST_CFM: Q4.1 R36.2 R46.2
ST_DTI_RTD: J4.7 R12.2 | length 8
  Top Layer w0.3: R12.2 109.281,66.948 109.631,66.598 110.231,66.598 J4.7
ST_IMD_MHS: R11.1 R32.2 R33.2
ST_IMD_OKHS: R10.1 R30.2 R31.2
ST_NRST: C11.2 R9.1 S?.3 S?.4 U2.7
ST_OSC_IN: C12.1 U2.5 Y1.2
ST_OSC_OUT: R7.1 U2.6
ST_PA0: J6.1 U2.10
ST_PA4: R10.2 U2.14
ST_PA5: J6.2 U2.15
ST_PA6: R34.1 R39.2 U2.16
ST_PA7: J10.1 U2.17
ST_PA8: J10.2 U2.29
ST_PA15: R11.2 U2.38
ST_PB0: J7.1 U2.18
ST_PB1: J7.2 U2.19
ST_PB2: R37.1 R42.2 U2.20
ST_PB3: J11.1 U2.39
ST_PB4: J11.2 U2.40
ST_PB5: J8.1 U2.41
ST_PB6: J8.3 U2.42
ST_PB7: J8.2 U2.43
ST_PB10: R36.1 R41.2 U2.21
ST_PB11: R35.1 R40.2 U2.22
ST_PB12: R12.1 U2.25
ST_PB13: R13.1 U2.26
ST_PB14: R14.1 U2.27
ST_PB15: R38.1 R43.2 U2.28
ST_PC13: D5.A U2.2
ST_PC14: D6.A U2.3
ST_PC15: D7.A U2.4
ST_PUMP: Q6.1 R38.2 R48.2
ST_RTD_BTN: J4.18 R14.2 R59.2 | length 12.6
  Top Layer w0.3: R59.2 109.281,61.624 109.631,61.274 110.938,61.274 114.266,57.946 117.883,57.946 J4.18
ST_SCL: U2.45 U4.SCL
ST_SDA: U2.46 U4.SDA
ST_SDC_SEN: R13.2 R18.2 R19.2 | length 3.5
  Top Layer w0.3: R18.2 140.015,56.992 141.535,58.512 142.017,58.512 R19.2
ST_SP: Q2.1 R34.2 R44.2
ST_SWCLK: J9.2 U2.37
ST_SWDIO: J9.1 U2.34
ST_UART_RXD: J5.2 U2.31
ST_UART_TXD: J5.1 U2.30
ST_VBAT: C10.2 U2.1
SW: C3.2 L1.2 U1.6 | length 11.7
  Top Layer w0.75: U1.6 75.629,56.066 75.629,58.229 C3.2 75.565,61.862 78.74,65.037 L1.2
U5_O1: R26.2 U5.1 U5.2 | length 1.3
  Top Layer w0.3: U5.2 U5.1
U6_O1: R27.2 U6.1 U6.2 | length 1.3
  Top Layer w0.3: U6.2 U6.1
U7_O1: R28.1 U7.1 U7.2 | length 1.3
  Top Layer w0.3: U7.2 U7.1
U8_O1: R30.1 U8.1 U8.2 | length 1.3
  Top Layer w0.381: U8.2 U8.1
U8_O2: R32.1 U8.6 U8.7 | length 1.3
  Top Layer w0.381: U8.6 U8.7
VCC3V3: C6.1 C7.1 C8.1 C9.1 C14.1 J3.2 J4.19 R60.1 R63.1 U2.9 U2.24 U2.36 U2.48 U3.3
VCC3V3B: C4.1 C5.1 D4.A J3.1 L1.1 R5.2 | length 28.3
  Top Layer w0.75: D4.A C4.1 65.984,71.699 66.492,71.699 68.651,73.858 J3.1 ; D4.A@66.009,66.863 66.134,66.738 66.134,66.733 66.573,66.294 L1.1 68.834,58.316 C5.1@67.691,57.173 ; R5.2 66.36,53.66 67.691,54.991 C5.1
VCC12V: C1.1 D2.1 D3.A J10.3 J11.3 Q1.2 Q7.2 Q8.2 Q9.2 Q10.2 Q11.2 R3.1 R54.2 R55.2 R56.2 R57.2 R58.2 U1.5 U5.8 U6.8 U7.8 U8.8 | length 35
  Top Layer w0.75: U1.5 77.445,55.052 77.884,54.613 77.884,54.288 78.009,54.163 R3.1
  Top Layer w1.5: D3.A 74.052,47.305 74.245,47.498 C1.1 ; C1.1@74.395,47.548 75.307,48.46 79.252,48.46 79.368,48.344 D2.1@79.404,48.344 ; R3.1 83.627,54.163 Q1.2 85.725,57.531 82.03,53.836 82.03,49.772 80.602,48.344 D2.1
VCC_3V3: J5.3 J6.3 J7.3 J9.3 R9.2 U4.VCC
XTAL: C13.1 R7.2 Y1.1
pads on no net: J4. U3.5 U4. U4.AD0 U4.INT U4.XCL U4.XDA

## Silkscreen, mask and mechanical layers (free items; w line width, h text height)
Mechanical 1:
  the board outline again, w0.254

## Text inside footprints (layer, text, board x,y; h text height)
D3: Top Overlay "+" at 70.501,48.122 h1 r90
D4: Top Overlay "+" at 64.659,67.68 h1 r90
D5: Mechanical 13 "+" at 150.545,81.645 h1
D6: Mechanical 13 "+" at 155.31,62.087 h1
D7: Mechanical 13 "+" at 160.136,91.424 h1
D8: Mechanical 13 "+" at 26.681,83.582 h1 r180
D9: Mechanical 13 "+" at 32.777,83.582 h1 r180
D10: Mechanical 13 "+" at 39,83.201 h1 r180
D11: Mechanical 13 "+" at 45.223,83.455 h1 r180
D12: Mechanical 13 "+" at 52.208,83.582 h1 r180